# Altium PCB Orion_PCB.PcbDoc (part 2 of 2)
Units mil, origin at the board's own origin, x right, y up, seen from the top; angles counter-clockwise.
Board outline 3401 x 1998 mil, 2 copper layers (Top Layer, Bottom Layer); 64 components, 48 nets, 235 pads, 54 vias.
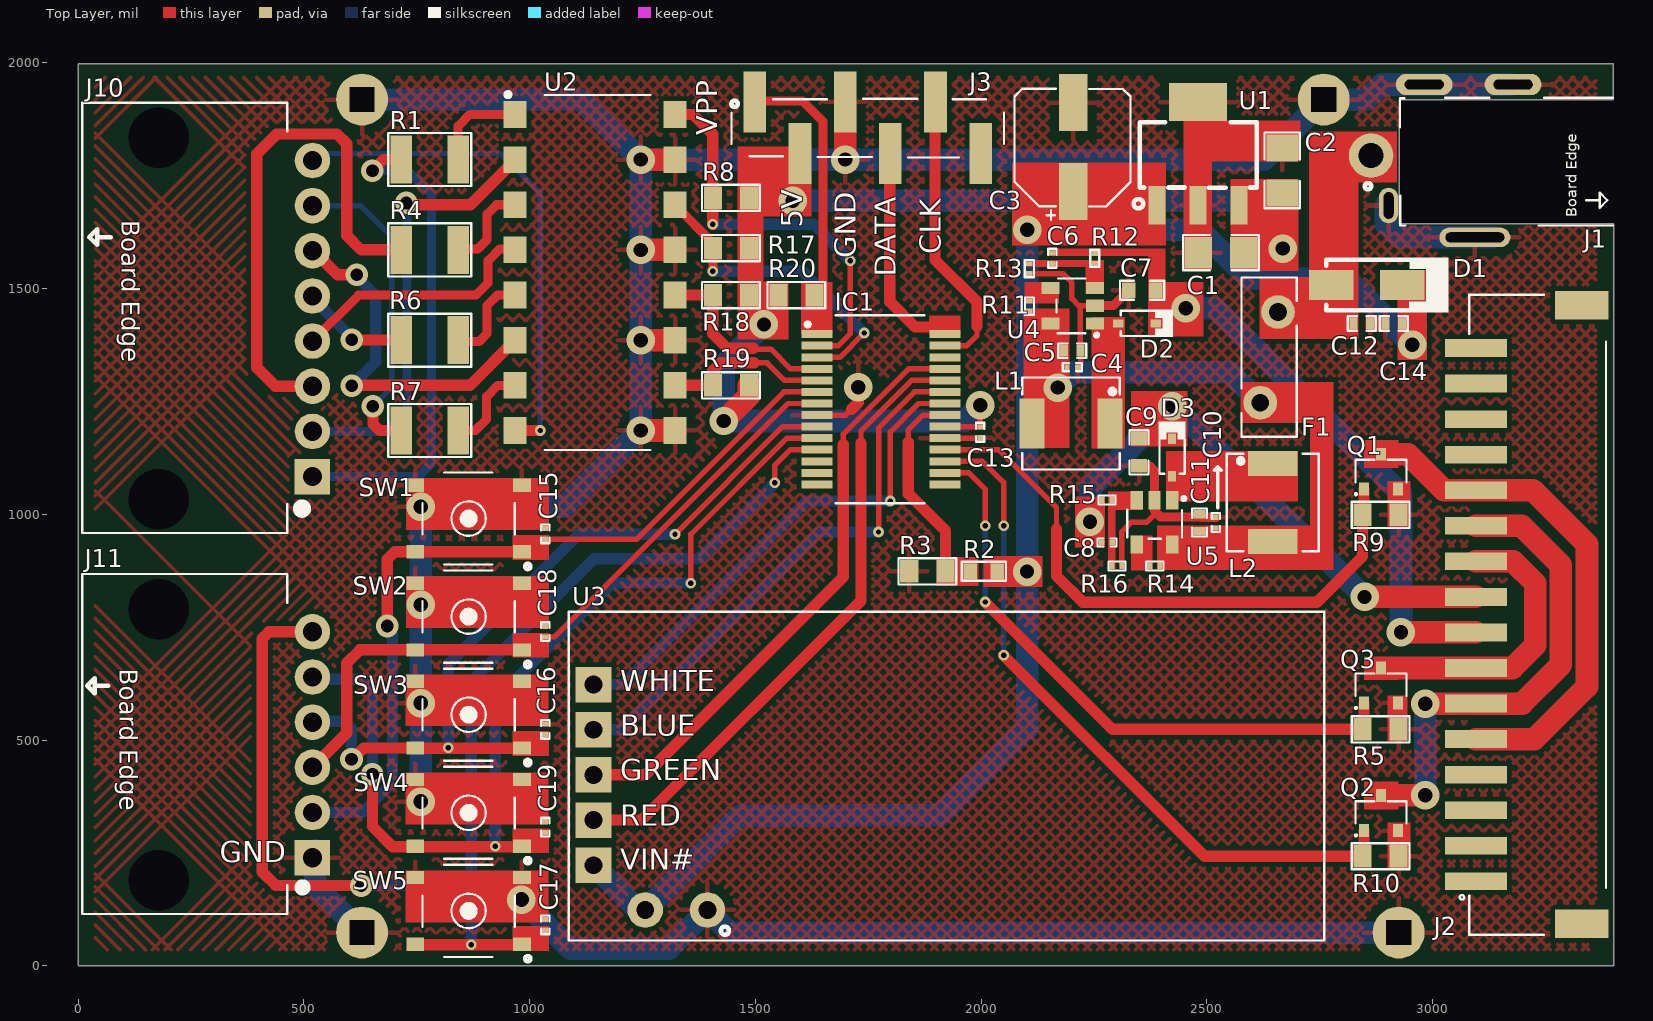
[diagram p0: Top Layer view]

## Via types
v1: diameter 62.99, hole 31.5, Top Layer to Bottom Layer, tented both sides, 20 vias
v2: diameter 23.62, hole 11.81, Top Layer to Bottom Layer, tented both sides, 17 vias
v3: diameter 50, hole 28, Top Layer to Bottom Layer, 10 vias
v4: diameter 62.99, hole 32.99, Top Layer to Bottom Layer, tented both sides, 5 vias
v5: diameter 62.99, hole 32.49, Top Layer to Bottom Layer, tented both sides, 2 vias

## Nets (pads, with @x,y where several pads share a name; then routed paths per layer and width w, separated by ;. In a path a pad name is that pad's centre, name@x,y a point inside that pad or via, vN(x,y) a via of type N, cw(c..) or ccw(c..) an arc to the next point about the centre after c; other vN are vias at no path point) (continued)
GND: (continued)
  Bottom Layer w50: J11.1@525,256 525,178 pad.MH4 ; pad.MH1 1113.33,1919 v1(1246.33,1786) ; v4(759,364) v4(759,582) v4(759,800) v4(759,1017) 1075,1017 v1@1244,1186 ; v4(982,147) 1091,38 1308,38 U3.1 1444,74 pad.MH3 ; v1@1245.17,1184.83 v1(1246.33,1186) v1(1246.33,1386) v1(1246.33,1586) v1(1246.33,1786) ; v1@1697,1790 v1@1693,1786 ; v1@1698,1786 v1@1693,1786 ; v1(1699,1786) 2626,1786 pad.MH2 2854,1919 2887.29,1952.29 J1.5 J1.4@3172.28,1952.29 ; J1.3@2896.69,1684.3 2896.69,1643.31 2926.29,1613.71 J1.2 J1.2@3130.71,1613.71 ; v1(1246.33,1786) v1@1693,1786
GREEN: IC1.25 U3.5 | length 1335.7
  Top Layer w12: 1695,1155 1695,1178 1839.57,1322.57 IC1.25
  Top Layer w25: U3.5 1256.21,423.21 1695,862 1695,1155
ICSPCLK: IC1.27 J3.5 | length 632
  Top Layer w12: IC1.27 1968.75,1373.75 1991,1396 1991,1417
  Top Layer w25: J3.5@1898,1909 1898,1564 1991,1471 1991,1417
ICSPDAT: IC1.28 J3.4 | length 462.2
  Top Layer w25: J3.4@1798,1794.04 1798,1471 1854,1415 1914,1415
NetR1_2: R1.2 U2.1 | length 208.8
  Top Layer w20: R1.2 841.99,1859.99 868,1886 U2.1@966,1886
NetR4_2: R4.2 U2.3 | length 201.4
  Top Layer w20: R4.2@840,1587 867,1587 ; 867,1588 885,1588 906,1609 906,1665 927,1686 U2.3
NetR6_2: R6.2 U2.5 | length 206.2
  Top Layer w20: R6.2 844.99,1383 888,1383 906,1401 906,1463 929,1486 U2.5
NetR7_2: R7.2 U2.7 | length 196.7
  Top Layer w20: R7.2 880,1186 905,1211 905,1261 930,1286 U2.7
PWR_IN: IC1.21 R2.1 R3.1 | length 596
  Top Layer w12: 1839,1160 1839,1188 1871.2,1220.2 IC1.21
  Top Layer w20: 1840,1049 1840,1148 ; R3.1 R2.1
  Top Layer w25: 1839,1160 1839,1046 1921,964 R3.1
RA0: IC1.2 R8.2 U2.16 | length 885.1
  Top Layer w12: IC1.2 1683.75,1373.75 1710,1400 v2(1710,1562)
  Top Layer w25: U2.16 1362,1886 1406,1842 R8.2 v2(1406,1643)
  Bottom Layer w25: v2(1406,1643) 1629,1643 v2(1710,1562)
RA1: IC1.3 R17.2 U2.14 | length 701.5
  Top Layer w12: IC1.3 1687.18,1348.16 v2(1741.02,1402)
  Top Layer w20: U2.14 1322.33,1684.95 R17.2@1406,1601.28 ; v2(1406,1539) R17.2 R17.2@1406,1601.28 ; R17.2@1406,1602.33 R17.2@1406,1601.28
  Bottom Layer w25: v2(1406,1539) 1604.02,1539 v2(1741.02,1402)
RA2: IC1.4 R18.2 U2.12 | length 431.2
  Top Layer w12: 1496,1366 1534.75,1366 1578.18,1322.57 IC1.4
  Top Layer w25: U2.12 R18.2 1406,1400 1438,1368 1496,1368
RA3: IC1.5 R19.2 U2.10 | length 370.1
  Top Layer w12: 1497,1336 1526,1336 1565.02,1296.98 IC1.5
  Top Layer w25: U2.10 R19.2 1406,1319 1423,1336 1497,1336
RA4: C15.1 IC1.6 J11.2 SW1.1 SW1.2 | length 1744.3
  Top Layer w12: SW1.1@982,918 982.82,917.18 SW1.1 ; C15.1 1035.12,945.07 1237.06,945.07 1563.39,1271.39 IC1.6
  Top Layer w20: SW1.1@982.11,917.18 SW1.1@982.82,917.18
  Top Layer w25: v3(685,753) 685,901 701.18,917.18 SW1.2@745.89,917.18 ; SW1.2@748.18,917.18 SW1.1@982.11,917.18
  Bottom Layer w25: J11.2 629.93,340 696.5,406.57 696.5,734.74 685,746.24 v3(685,753)
RA5: C18.1 IC1.7 J11.3 SW2.1 SW2.2 | length 1467.8
  Top Layer w12: C18.1 1055.69,728.69 1572.8,1245.8 IC1.7
  Top Layer w25: J11.3 595,515.84 595,671 624.18,700.18 SW2.2@745.89,700.18 ; SW2.2@756.18,700.18 SW2.1@983.11,700.18
RA6: C16.1 IC1.9 J11.4 SW3.1 SW3.2 | length 1767.6
  Top Layer w12: v2(1322,956) 1560.61,1194.61 IC1.9
  Top Layer w25: v3@605.96,457.96 608.1,457.96 632.83,482.68 739.7,482.68 SW3.2 ; SW3.2@746.89,482.18 SW3.1@982.11,482.18
  Bottom Layer w25: J11.4 521.16,542 590,542 605.69,526.31 v3(605.69,458.23) ; v2(820,483.18) 820,668 1108,956 v2(1322,956)
RA7: C19.1 IC1.10 J11.5 SW4.1 SW4.2 | length 2136.3
  Top Layer w12: v2(1357,848) 1357,956 1570.02,1169.02 IC1.10
  Top Layer w25: v3(652,425) 652,309 696.82,264.18 SW4.1@982.11,264.18
  Bottom Layer w25: J11.5 524.16,635 630,635 652,613 v3(652,425) ; v2(924,265.18) 924,589 1183,848 v2(1357,848)
RC0: C17.1 IC1.11 J11.6 SW5.1 SW5.2 | length 2939.1
  Top Layer w12: v2(1543,1070) 1543,1108 1578.43,1143.43 IC1.11
  Top Layer w25: J11.6 422.64,740 408,725.36 408,208 438,178 v3(627,178) ; SW5.2@745.89,47.18 v2(871,47.18) SW5.1@982.11,47.18
  Bottom Layer w25: v3(627,178) 847.18,178 871,201.82 ; v2(871,47.18) 871,201.82 ; v2(1543,1070) 1375,902 1143,902 871,630 871,201.82
RC5: IC1.16 Q3.1 R5.2 | length 1367
  Top Layer w12: IC1.16 1972.75,1092.25 2009,1056 v2(2009,975)
  Top Layer w25: v2(2008.94,806) 2290.94,524 R5.2 2848.2,527.2 Q3.1
  Bottom Layer w12: v2(2008.94,806) 2009,806.06 v2(2009,975)
RC6: IC1.17 Q2.1 R10.2 | length 1570.3
  Top Layer w12: IC1.17 2003.16,1117.84 2050,1071 v2(2050,975)
  Top Layer w25: v2(2050,688) 2495,243 R10.2 2848.2,246.2 Q2.1
  Bottom Layer w12: v2(2050,688) v2(2050,975)
RC7: IC1.18 Q1.1 R9.2 | length 1346.3
  Top Layer w12: IC1.18 2038.57,1143.43 2167,1015 2167,967.35
  Top Layer w25: 2167,967.35 2167,864 2225.5,805.5 2743.83,805.5 2845,906.67 R9.2 2848.2,1002.2 Q1.1
RED: IC1.24 U3.4 | length 1421.7
  Top Layer w12: 1734,1158 1734,1185 1846,1297 1869,1297 ; 1848.98,1296.98 IC1.24
  Top Layer w25: U3.4 1248.21,323.21 1734,809 1734,1158
SHDN1: R11.2 U4.4 | length 52.1
  Top Layer w12: 2107,1489 2119.79,1501.79 U4.4
SHDN2: R14.2 U5.4
SW1: D2.1 L1.1 U4.1 | length 162
  Top Layer w25: L1.1@2282.61,1200.42 2282.61,1362.39
SW2: D3.1 L2.1 U5.1 | length 101.3
  Top Layer w25: 2544.65,1113.23 L2.1
VIN: C12.1 D1.1 F1.1 J1.1 | length 204.4
  Top Layer w50: D1.1 2775.26,1712.35
VIN#: C3.1 C14.1 D1.2 R2.2 U1.1 U3.2 U3.3 | length 3217
  Bottom Layer w50: U3.3 U3.2@1242.85,122 ; U3.2 1465.2,333 1695,333 ; 1695,334 1909,334 2102,527 v1(2102,873.55) v5(2102,1630.24) 2484.76,1630.24 2593,1522 2809,1522 v1(2955,1376)
VOUT_5V: C1.1 C2.1 C13.1 IC1.20 J3.2 R8.1 R17.1 R18.1 R19.1 R20.1 U1.3 | length 2289.1
  Top Layer w12: IC1.20 1998,1194.61 v1(1998,1242)
  Top Layer w50: v1(1430,1207) 1486,1263 R19.1 ; R18.1 1520,1486 v1@1520,1421
  Bottom Layer w50: v1(1519,1421) 1430,1332 v1(1430,1207) 1963,1207 v1(1998,1242) ; v1(1583,1695) 2562,1695 v1(2668,1589)
VPP: IC1.1 J3.1 R20.2 | length 562.4
  Top Layer w20: J3.1 1501.04,1916 1604,1916 1649.5,1870.5 1649.5,1504.5 R20.2
WHITE: IC1.22 U3.7 | length 1126.2
  Top Layer w12: v2(1799,1030) 1799,1183 1861.8,1245.8 IC1.22
  Bottom Layer w12: U3.7@1141,622 U3.7@1141.64,622
  Bottom Layer w25: U3.7 1207.21,623.21 1614,1030 v2(1799,1030)
pads on no net: IC1.12 IC1.13 IC1.14 IC1.15 IC1.26 J2.1 J2.2 J2.3 J2.4 J2.13 J2.14 J2.15 J2.16 J2.MP1 J2.MP2 J3.6 J10.MH1 J10.MH2 J11.MH1 J11.MH2

## Polygon pours and split planes (outlines as drawn)
GND on Top Layer "GND_L01_P000" (hatched 45Degree grid 20 track 8, remove dead copper, pour order 0): 37.98,1968 3361,1968 3361,36 37.98,36
GND on Bottom Layer "GND_L02_P002" (hatched 45Degree grid 20 track 8, remove dead copper, pour order 2): 39,1965 3362,1965 3362,36 39,36

## Other copper
Top Layer:
  rectangle net GND: 2900,972 2951,1074
  rectangle net GND: 2900,497 2945,599
  region net SW2: 2701.42,1029 2701.42,1140.61 2410,1140.61 2410,1029
  rectangle net SW1: 2245,1146 2319,1437
  region net FB2: 2358.42,1010.21 2358.42,1051.21 2281,1051.21 2281,1010.21
  rectangle net FB1: 2231,1488 2272,1564
  rectangle net BOOST1: 2370,1394 2409,1581
  region net BOOST1: 2409,1588.84 2149.02,1588.84 2149.02,1572.84 2409,1572.84
  region net FB2: 2297.43,877.98 2297.43,1040.98 2281.43,1040.98 2281.43,877.98
  rectangle net FB1: 2097,1548 2260,1564
  region net BOOST1: 2370.57,1514.42 2370.57,1394 2492.57,1394 2492.57,1514.42
  rectangle net RA4: 962.12,899.38 1043.12,954.38
  rectangle net RA5: 962,683 1043,738
  rectangle net RA6: 962,465.2 1043,520.2
  rectangle net RC0: 962,33.5 1043,88.5
  rectangle net RA7: 962,250 1043,305
  rectangle net BOOST2: 2208,927 2274,1040
  rectangle net BOOST2: 2332,1151 2457,1273
  rectangle net FUSE_OUT: 2728,877 2781,1204
  rectangle net FUSE_OUT: 2575,1203 2781,1293
  rectangle net GND: 2852,1405 2905,1441
  rectangle net VIN#: 2922,1342 2988,1542
  rectangle net VIN: 2773,1735 2921,1848
  rectangle net VIN: 2726,1469 2836,1848
  rectangle net VIN: 2617,1389 2836,1526
  region net SHDN1: 2173,1466.83 2173,1514.83 2096,1514.83 2096,1466.83
  rectangle net SHDN2: 2332,876 2380,953
  region net FUSE_OUT: 2094.39,1456.42 2094.39,1147 2196.39,1147 2196.39,1456.42
  rectangle net FUSE_OUT: 2390,877 2777,976
  rectangle net VOUT_5V: 1460,1388 1518,1686
  region net VOUT_5V: 1624,1660 1624,1814.85 1460,1814.85 1460,1660
  rectangle net VOUT_5V: 1461,1388 1573,1516
  rectangle net PWR_IN: 1901,842 1994,906
  rectangle net GND: 726,966 1043,1081
  rectangle net GND: 726,748.75 1043,863.75
  rectangle net GND: 725,531 1042,646
  rectangle net GND: 725,313 1042,428
  region net VIN#: 2068,1780 2068,1596.12 2409.53,1596.12 2409.53,1780
  rectangle net VOUT_5V: 2552,1539 2703,1743.53
  rectangle net GND: 2448,1541 2511,1956
  rectangle net GND: 2448,1782 2708,1873
  rectangle net VPP: 1601.54,1399.34 1670.54,1515
  rectangle net ICSPDAT: 1885,1399.34 1954,1441
  rectangle net GND: 725,96 1042,211
  rectangle net GND: 2900,216 2951,318
  region net VIN#: 2005,908 2005,839 2136,839 2136,908
  rectangle net FET_2: 2848,347 2924,409
  rectangle net FET_3: 2848,633 2924,685
  rectangle net FET_1: 2848,1103 2924,1165
  pour cut-out: 3401.69,1637.3 3401.69,1655.3 3401.69,1925.3 2925.69,1925.3 2925.69,1637.3
Bottom Layer:
  pour cut-out: 3401.69,1637.3 3401.69,1655.3 3401.69,1925.3 2926,1925.3 2926,1637.3

## Silkscreen, mask and mechanical layers (free items; w line width, h text height)
Top Overlay:
  lines w8: 2517,1098 2524.5,1105.5 ; 2524,1015 2524,1105.5 2524.5,1105.5 ; 2532,1098 2524.5,1105.5
  text "VPP" at 1430.73,1840 h80 r90
  text "5V" at 1620,1635.13 h80 r90
  text "CLK" at 1925.71,1576 h80 r90
  text "GND" at 1738,1567.49 h80 r90
  text "DATA" at 1826,1526.35 h80 r90
  text "WHITE" at 1201.35,593 h80
  text "BLUE" at 1201.35,494.75 h80
  text "GREEN" at 1201.35,395.54 h80
  text "RED" at 1201.35,295.37 h80
  text "GND" at 314,214 h80
  text "VIN#" at 1201.35,197.05 h80
Bottom Overlay:
  drawing of 3078 lines, arcs and shapes, not listed
  text "ZERO CARBON FOOTPRINT" at 1102,1825 h38 r90
Mechanical 2:
  the board outline again, w10

## Dimensions
3401,1998 to 0,1998 on Mechanical 1
3098,0 to 3401,1998 on Mechanical 1

## Text inside footprints (layer, text, board x,y; h text height)
J1: Top Overlay "Board Edge" at 3318.82,1658.5 h23.62 r90
J10: Top Overlay "Board Edge" at 97.2,1652 h39.37 r270
J11: Top Overlay "Board Edge" at 92.2,658 h39.37 r270